# Altium PCB 400390.PcbDoc (part 2 of 5)
Units mm, origin at the board's own origin, x right, y up, seen from the top; angles counter-clockwise.
Board outline 50.8 x 50.4 mm, 4 copper layers (Top Layer, Mid Layer 1, Mid Layer 2, Bottom Layer), stack 1.507 mm thick; 262 components, 210 nets, 1216 pads, 1075 vias.
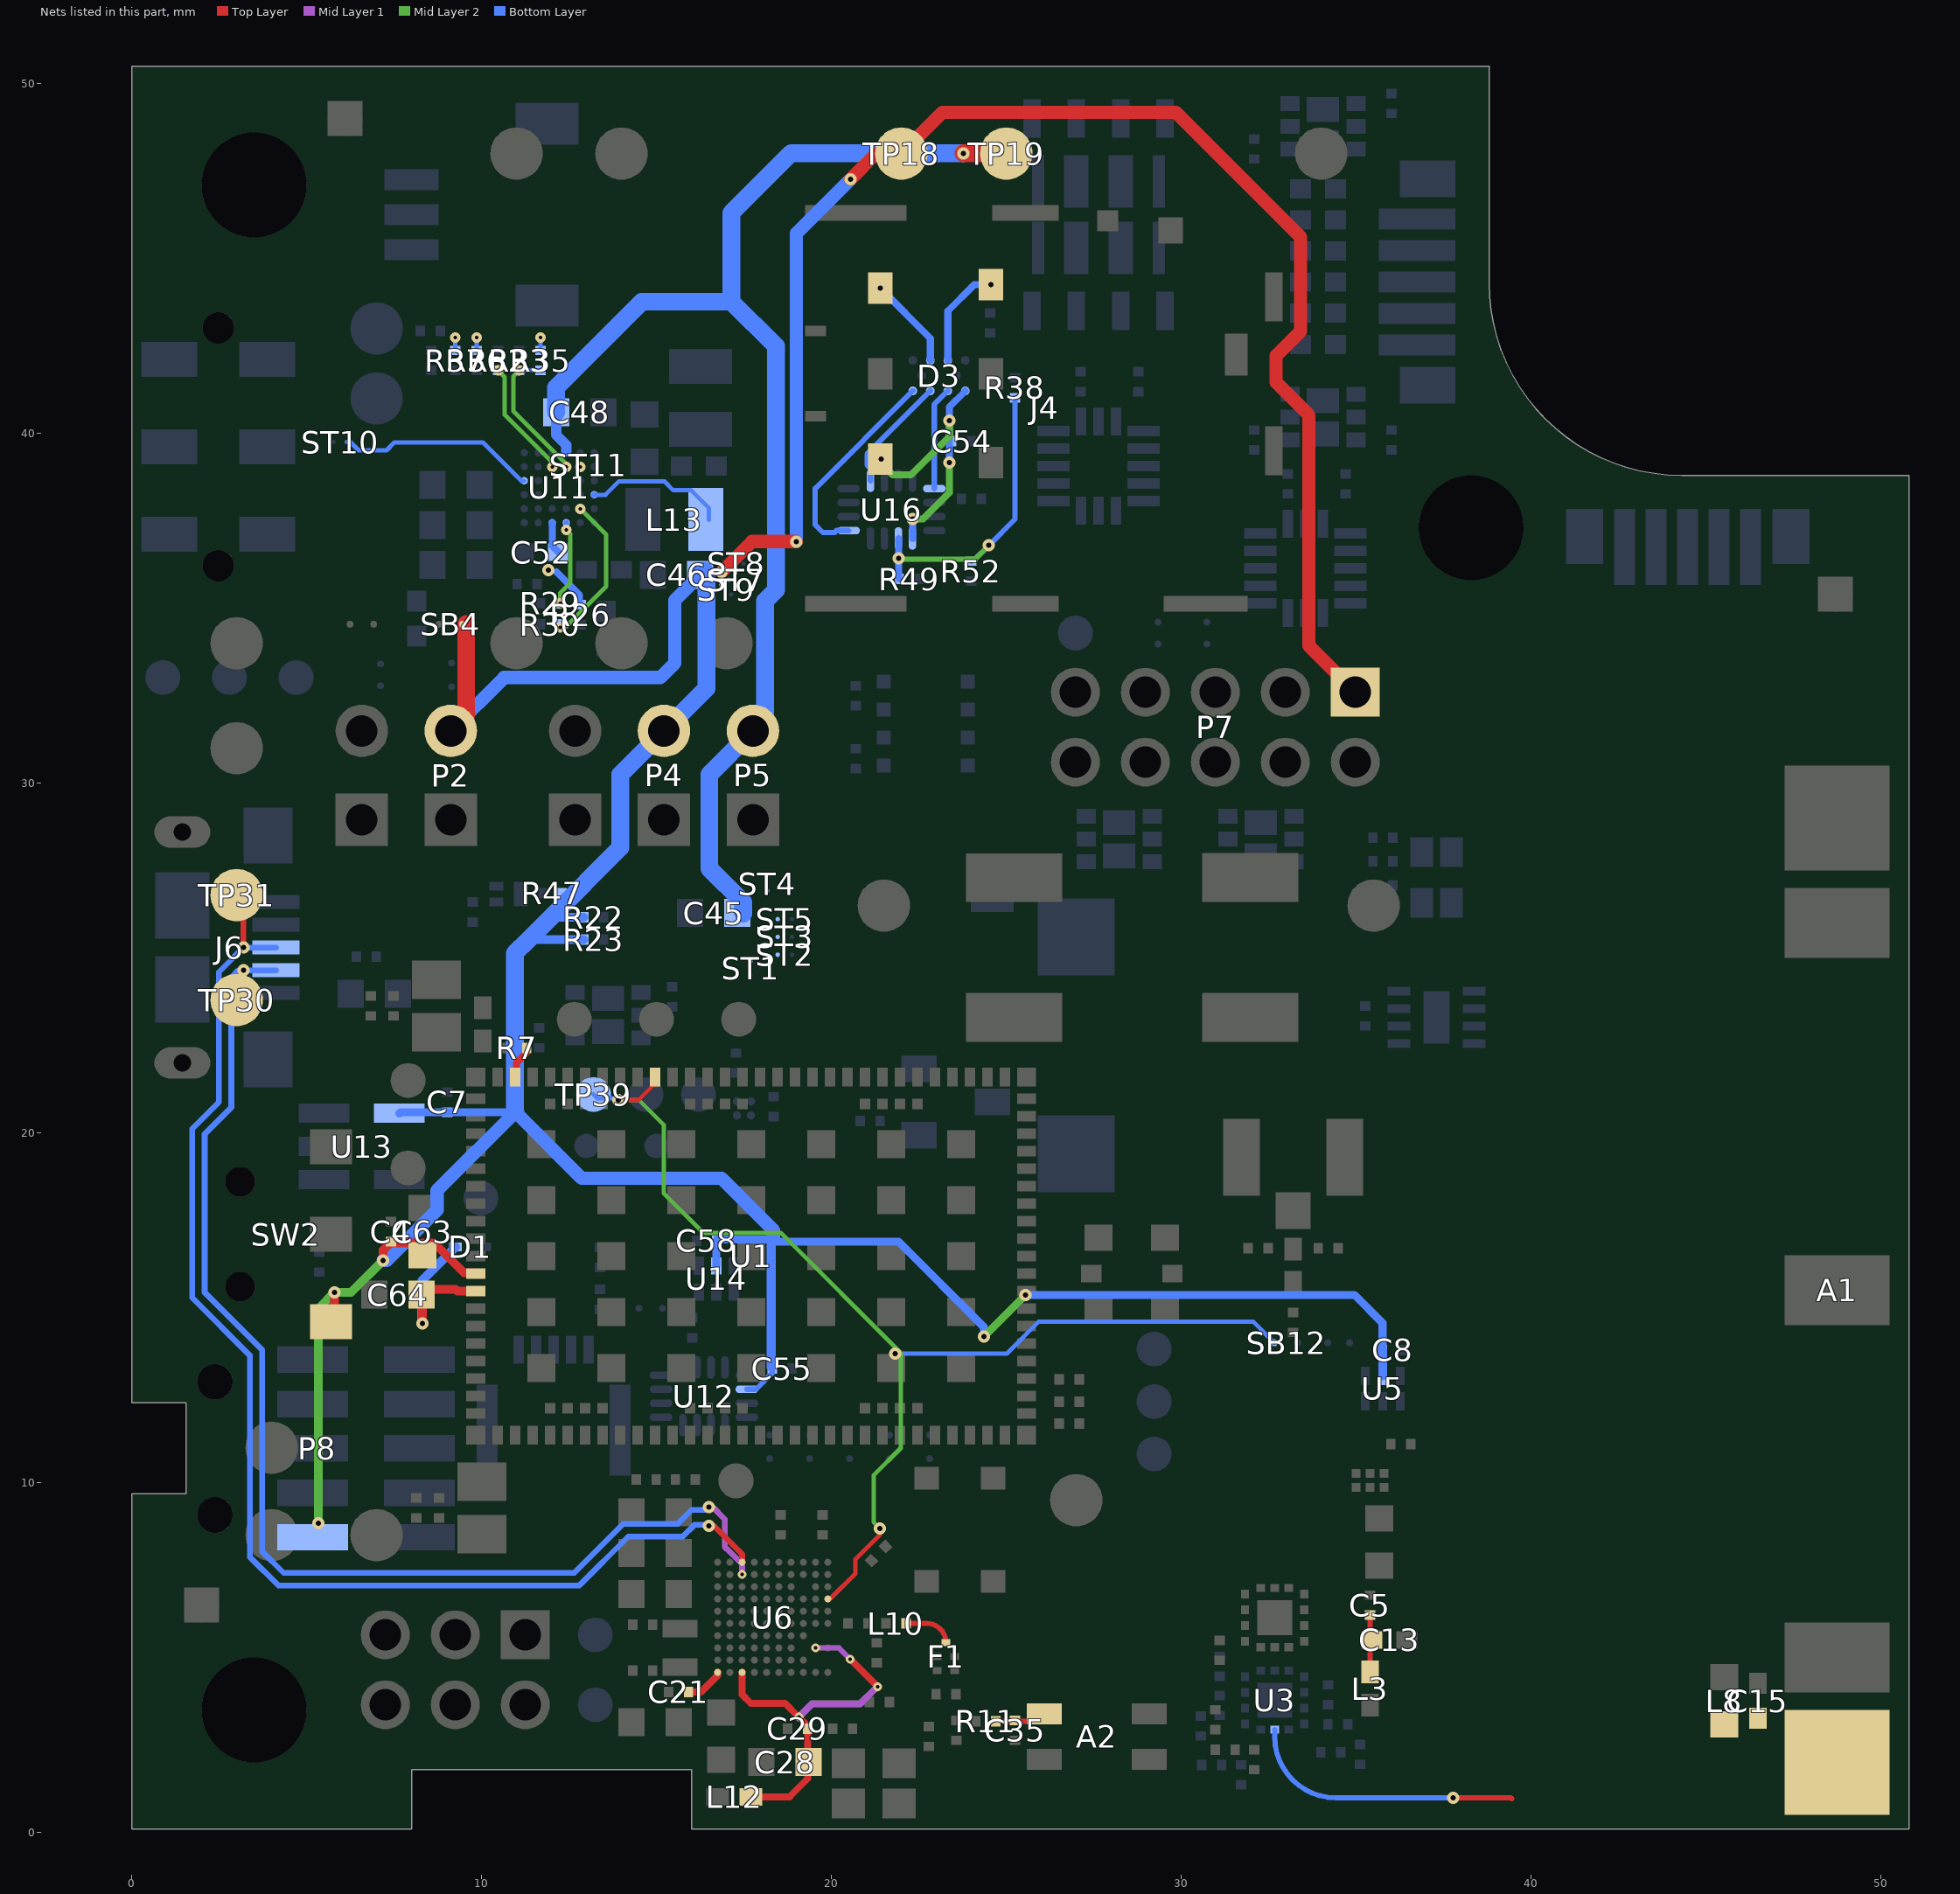
[diagram p4: the nets of this part, all layers, seen from the top]

## Part data
A1: library part FR01-S4-210-D, "Mobile IoT LTE Multi-Band Antenna", Manufacturer="Fractus Antennas", Part number IPS=80000001819, Supplier Part Number 1=N.A., Artikkelnr Noca=N.A., Component Class=Antennas, ComponentLink1Description=Datasheet, ComponentLink1URL=https://www.fractusantennas.com/wp-content/uploads/2018/01/DS_FR01-S4-210.pdf, ComponentLink2Description="Supplier link", ComponentLink2URL=https://www.fractusantennas.com/trio-mxtend-mobile-iot-antenna/, Footprint Doc=FR01-S4-210, HelpURL=https://www.fractusantennas.com/wp-content/uploads/2018/02/UM_FR01-S4-210.pdf, LatestRevisionDate=2018-07-09, Manufacturer Part Number=FR01-S4-210, Note=N.A., Pad Count=5, Part Number=FR01-S4-210-D, PartId=100700054, Published=2018-07-09, Supplier 1=N.A., Supplier 2=N.A., Supplier Part Number 2=N.A.
A2: library part "Johanson 2450AT18D0100_STD-R", "2.45 GHz chip antenna", Manufacturer="Johanson Technology", Part number IPS=00000001415, Supplier Part Number 1=2450AT18D0100E, Artikkelnr Noca=53059035, Component Class=Antennas, ComponentLink1Description=Datasheet, ComponentLink1URL=N.A., ComponentLink2Description="Supplier link", ComponentLink2URL=N.A., Footprint Doc=2450AT18D0100, HelpURL=http://www.johansontechnology.com/datasheets/antennas/2450AT18D0100.pdf, LatestRevisionDate=2016-06-02, Manufacturer Part Number=2450AT18D0100, Note=N.A., Pad Count=4, Part Number="Johanson 2450AT18D0100_STD-R", PartId=100700005, Published=2016-01-12, Supplier 1=Digi-Key, Supplier 2=Mouser, Supplier Part Number 2=609-2450AT18D0100E
Bz1: library part AST7525MATRQ, "Buzzer Transducer, 3.6V 100mA 2.7kHz 85dB @ 3.6V, SMD", Manufacturer=Mallory, Part number IPS=00000001770, Supplier Part Number 1=458-1100-1-ND, Artikkelnr Noca=N.A., Component Class=Transducers, ComponentLink1Description=Datasheet, ComponentLink1URL=N.A., ComponentLink2Description="Supplier link", ComponentLink2URL=N.A., Footprint Doc=Buzzer_SMD_7.5x7.5, HelpURL=https://www.mspindy.com/specifications/AST7525MATRQ.pdf, LatestRevisionDate=2019-01-14, Manufacturer Part Number=AST7525MATRQ, Note=N.A., Pad Count=2, Part Number=AST7525MATRQ, PartId=101000024, Published=2019-01-14, Supplier 1=Digi-Key, Supplier 2=Mouser, Supplier Part Number 2=539-AST7525MATRQ
C1 C65: library part C0201-15p, "Capacitor, NP0, ±5%, 25V", Manufacturer=N.A., Part number IPS=00000003193, Artikkelnr Noca=N.A., Component Class=Capacitors, ComponentLink1Description=Datasheet, ComponentLink1URL=N.A., ComponentLink2Description="Supplier link", ComponentLink2URL=N.A., Footprint Doc=0201, HelpURL=N.A., LatestRevisionDate=2020-10-13, Manufacturer Part Number=N.A., Note=25V, Pad Count=2, Part Number=C0201-15p, PartId=100200034, Published=2014-11-13, Supplier 1=N.A., Supplier 2=N.A., Supplier Part Number 1=N.A., Supplier Part Number 2=N.A.
C2 C4 C7 C8 C21 C23 C24 C26 C34 C36 C37 C38 C39 C40 C41 C42 C44 C55 C58 C66 C68: library part C0201-100n, "Capacitor, X5R, ±10%", Manufacturer=N.A., Part number IPS="00000001248, 00000002505", Artikkelnr Noca=N.A., Component Class=Capacitors, ComponentLink1Description=Datasheet, ComponentLink1URL=N.A., ComponentLink2Description="Supplier link", ComponentLink2URL=N.A., Footprint Doc=0201, HelpURL=N.A., LatestRevisionDate=2017-11-09, Manufacturer Part Number=N.A., Note=16V, Pad Count=2, Part Number=C0201-100n, PartId=100200078, Published=2014-11-13, Supplier 1=N.A., Supplier 2=N.A., Supplier Part Number 1=N.A., Supplier Part Number 2=N.A.
C3 C67: library part C0805-47µ-10V, "Capacitor, X5R, ±20%, 10V", Manufacturer=Murata, Manufacturer Part Number=GRM21BR61A476ME15, Part number IPS=00000004759, Supplier Part Number 1=490-9961-1-ND, Artikkelnr Noca=N.A., Component Class=Capacitors, ComponentLink1Description=Datasheet, ComponentLink1URL=https://search.murata.co.jp/Ceramy/image/img/A01X/G101/ENG/GRM21BR61A476ME15-01A.pdf, ComponentLink2Description="Supplier link", ComponentLink2URL=N.A., Footprint Doc=0805, HelpURL=https://www.murata.com/en-global/products/productdetail?partno=GRM21BR61A476ME15%23, LatestRevisionDate=2020-10-23, Note=10V, Pad Count=2, Part Number=C0805-47µ-10V, PartId=100200288, Published=2020-08-14, Supplier 1=Digi-Key, Supplier 2=N.A., Supplier Part Number 2=N.A.
C5: library part C0201-1n0, "Capacitor, X7R, ±10%, 25V", Manufacturer=N.A., Part number IPS=00000003206, Artikkelnr Noca=N.A., Component Class=Capacitors, ComponentLink1Description=Datasheet, ComponentLink1URL=N.A., ComponentLink2Description="Supplier link", ComponentLink2URL=N.A., Footprint Doc=0201, HelpURL=N.A., LatestRevisionDate=2020-10-13, Manufacturer Part Number=N.A., Note=16V, Pad Count=2, Part Number=C0201-1n0, PartId=100200056, Published=2014-11-13, Supplier 1=N.A., Supplier 2=N.A., Supplier Part Number 1=N.A., Supplier Part Number 2=N.A.
C6: library part C0201-33n, "Capacitor, X5R, ±10%", Manufacturer=N.A., Part number IPS=00000003839, Artikkelnr Noca=N.A., Component Class=Capacitors, ComponentLink1Description=Datasheet, ComponentLink1URL=N.A., ComponentLink2Description="Supplier link", ComponentLink2URL=N.A., Footprint Doc=0201, HelpURL=N.A., LatestRevisionDate=2020-01-07, Manufacturer Part Number=N.A., Note=10V, Pad Count=2, Part Number=C0201-33n, PartId=100200073, Published=2014-11-13, Supplier 1=N.A., Supplier 2=N.A., Supplier Part Number 1=N.A., Supplier Part Number 2=N.A.
C9: library part C0201-2.5p-HQ-Murata, "Capacitor, NP0, ±0.05pF, 25V", Manufacturer=Murata, Manufacturer Part Number=GJM0335C1E2R5WB01, Part number IPS="00000001771, 80000001936", Supplier Part Number 1=N.A., Artikkelnr Noca=N.A., Component Class=Capacitors, ComponentLink1Description=Datasheet, ComponentLink1URL=N.A., ComponentLink2Description="Supplier link", ComponentLink2URL=N.A., Footprint Doc=0201, HelpURL=https://psearch.en.murata.com/capacitor/product/GJM0335C1E2R5WB01%23.html, LatestRevisionDate=2020-02-07, Note=25V, Pad Count=2, Part Number=C0201-2.5p-HQ-Murata, PartId=100200420, Published=2019-01-14, Supplier 1=N.A., Supplier 2=N.A., Supplier Part Number 2=N.A.
C10: library part C0201-5.5p-HQ-Murata, "Capacitor, NP0, ±0.05pF, 25V", Manufacturer=Murata, Manufacturer Part Number=GJM0332C1H5R5WB01, Part number IPS="00000001772, 80000001937", Supplier Part Number 1=N.A., Artikkelnr Noca=N.A., Component Class=Capacitors, ComponentLink1Description=Datasheet, ComponentLink1URL=N.A., ComponentLink2Description="Supplier link", ComponentLink2URL=N.A., Footprint Doc=0201, HelpURL=https://psearch.en.murata.com/capacitor/product/GJM0332C1H5R5WB01%23.html, LatestRevisionDate=2019-10-28, Note=25V, Pad Count=2, Part Number=C0201-5.5p-HQ-Murata, PartId=100200425, Published=2019-10-28, Supplier 1=N.A., Supplier 2=N.A., Supplier Part Number 2=N.A.
C11: library part C0201-9.2p-HQ-Murata, "Capacitor, NP0, ±0.05pF, 25V", Manufacturer=Murata, Manufacturer Part Number=GJM0332C1E9R2WB01, Part number IPS=80000001956, Supplier Part Number 1=N.A., Artikkelnr Noca=N.A., Component Class=Capacitors, ComponentLink1Description=Datasheet, ComponentLink1URL=N.A., ComponentLink2Description="Supplier link", ComponentLink2URL=N.A., Footprint Doc=0201, HelpURL=https://psearch.en.murata.com/capacitor/product/GJM0332C1E9R2WB01%23.html, LatestRevisionDate=2019-03-27, Note=25V, Pad Count=2, Part Number=C0201-9.2p-HQ-Murata, PartId=100200427, Published=2019-03-27, Supplier 1=N.A., Supplier 2=N.A., Supplier Part Number 2=N.A.
C12: library part C0201-1.5p-HQ-Murata, "Capacitor, NP0, ±0.05pF, 25V", Manufacturer=Murata, Manufacturer Part Number=GJM0334C1E1R5WB01, Part number IPS="00000001774, 80000001939", Supplier Part Number 1=N.A., Artikkelnr Noca=N.A., Component Class=Capacitors, ComponentLink1Description=Datasheet, ComponentLink1URL=N.A., ComponentLink2Description="Supplier link", ComponentLink2URL=N.A., Footprint Doc=0201, HelpURL=https://psearch.en.murata.com/capacitor/product/GJM0334C1E1R5WB01%23.html, LatestRevisionDate=2019-01-14, Note=25V, Pad Count=2, Part Number=C0201-1.5p-HQ-Murata, PartId=100200418, Published=2019-01-14, Supplier 1=N.A., Supplier 2=N.A., Supplier Part Number 2=N.A.
C13: library part C0402-2.5p-HQ-Murata, "Capacitor, NP0, ±0.05pF, 50V", Manufacturer=Murata, Manufacturer Part Number=GJM1555C1H2R5WB01, Part number IPS=00000004340, Supplier Part Number 1=490-11208-1-ND, Artikkelnr Noca=N.A., Component Class=Capacitors, ComponentLink1Description=Datasheet, ComponentLink1URL=N.A., ComponentLink2Description="Supplier link", ComponentLink2URL=N.A., Footprint Doc=0402, HelpURL=https://psearch.en.murata.com/capacitor/product/GJM1555C1H2R5WB01%23.html, LatestRevisionDate=2020-02-07, Note=50V, Pad Count=2, Part Number=C0402-2.5p-HQ-Murata, PartId=100200428, Published=2020-02-07, Supplier 1=Digi-Key, Supplier 2=N.A., Supplier Part Number 2=N.A.
C14: library part C0201-3.1p-HQ-Murata, "Capacitor, NP0, ±0.05pF, 25V", Manufacturer=Murata, Manufacturer Part Number=GJM0335C1E3R1WB01, Part number IPS="00000001776, 80000001941", Supplier Part Number 1=N.A., Artikkelnr Noca=N.A., Component Class=Capacitors, ComponentLink1Description=Datasheet, ComponentLink1URL=N.A., ComponentLink2Description="Supplier link", ComponentLink2URL=N.A., Footprint Doc=0201, HelpURL=https://psearch.en.murata.com/capacitor/product/GJM0335C1E3R1WB01%23.html, LatestRevisionDate=2019-01-14, Note=25V, Pad Count=2, Part Number=C0201-3.1p-HQ-Murata, PartId=100200423, Published=2019-01-14, Supplier 1=N.A., Supplier 2=N.A., Supplier Part Number 2=N.A.
C15: library part C0402-0.5p-HQ-Murata, "Capacitor, NP0, ±0.05pF, 50V", Manufacturer=Murata, Manufacturer Part Number=GJM1555C1HR50WB01, Part number IPS=00000004293, Supplier Part Number 1=490-11250-1-ND, Artikkelnr Noca=N.A., Component Class=Capacitors, ComponentLink1Description=Datasheet, ComponentLink1URL=https://search.murata.co.jp/Ceramy/image/img/A01X/G101/ENG/GJM1555C1HR50WB01-01.pdf, ComponentLink2Description="Supplier link", ComponentLink2URL=N.A., Footprint Doc=0402, HelpURL=https://psearch.en.murata.com/capacitor/product/GJM1555C1HR50WB01%23.html, LatestRevisionDate=2020-02-07, Note=50V, Pad Count=2, Part Number=C0402-0.5p-HQ-Murata, PartId=100200434, Published=2020-02-07, Supplier 1=Digi-Key, Supplier 2=Mouser, Supplier Part Number 2=81-GJM1555C1HR50WB1D
C16 C17: library part C0201-2n2, "Capacitor, X7R, ±10%, 10V", Manufacturer=N.A., Part number IPS=00000001778, Artikkelnr Noca=N.A., Component Class=Capacitors, ComponentLink1Description=Datasheet, ComponentLink1URL=N.A., ComponentLink2Description="Supplier link", ComponentLink2URL=N.A., Footprint Doc=0201, HelpURL=N.A., LatestRevisionDate=2014-11-13, Manufacturer Part Number=N.A., Note=10V, Pad Count=2, Part Number=C0201-2n2, PartId=100200060, Published=2014-11-13, Supplier 1=N.A., Supplier 2=N.A., Supplier Part Number 1=N.A., Supplier Part Number 2=N.A.
C18 C19 C30 C31: library part C0201-12p, "Capacitor, NP0, ±2%", Manufacturer=N.A., Part number IPS=00000007848, Artikkelnr Noca=N.A., Component Class=Capacitors, ComponentLink1Description=Datasheet, ComponentLink1URL=N.A., ComponentLink2Description="Supplier link", ComponentLink2URL=N.A., Footprint Doc=0201, HelpURL=N.A., LatestRevisionDate=2017-11-09, Manufacturer Part Number=N.A., Note=25V, Pad Count=2, Part Number=C0201-12p, PartId=100200033, Published=2014-11-13, Supplier 1=N.A., Supplier 2=N.A., Supplier Part Number 1=N.A., Supplier Part Number 2=N.A.
C20: library part C0201-1.0p, "Capacitor, NP0, ±0.05pF, 50V", Manufacturer=N.A., Part number IPS=00000001247, Artikkelnr Noca=N.A., Component Class=Capacitors, ComponentLink1Description=Datasheet, ComponentLink1URL=N.A., ComponentLink2Description="Supplier link", ComponentLink2URL=N.A., Footprint Doc=0201, HelpURL=N.A., LatestRevisionDate=2018-10-22, Manufacturer Part Number=N.A., Note=50V, Pad Count=2, Part Number=C0201-1.0p, PartId=100200014, Published=2014-11-13, Supplier 1=N.A., Supplier 2=N.A., Supplier Part Number 1=N.A., Supplier Part Number 2=N.A.
C22 C32: library part C0603-4µ7-6.3V-X7R, "Capacitor, X7R, ±10%, 6.3V", Manufacturer="Samsung Electro-Mechanics America", Manufacturer Part Number=CL10B475KQ8NQNC, Part number IPS=00000002541, Supplier Part Number 1=1276-2087-1-ND, Artikkelnr Noca=20039473, Component Class=Capacitors, ComponentLink1Description=Datasheet, ComponentLink1URL=N.A., ComponentLink2Description="Supplier link", ComponentLink2URL=N.A., Footprint Doc=0603, HelpURL=http://media.digikey.com/pdf/Data%20Sheets/Samsung%20PDFs/CL10B475KQ8NQNC_Spec.pdf, LatestRevisionDate=2015-06-10, Note=6.3V, Pad Count=2, Part Number=C0603-4µ7-6.3V-X7R, PartId=100200350, Published=2015-06-10, Supplier 1=Digi-Key, Supplier 2=N.A., Supplier Part Number 2=N.A.
C25: library part C0201-820p, "Capacitor, X7R, ±10%", Manufacturer=N.A., Part number IPS=00000001249, Artikkelnr Noca=N.A., Component Class=Capacitors, ComponentLink1Description=Datasheet, ComponentLink1URL=N.A., ComponentLink2Description="Supplier link", ComponentLink2URL=N.A., Footprint Doc=0201, HelpURL=N.A., LatestRevisionDate=2017-11-09, Manufacturer Part Number=N.A., Note=25V, Pad Count=2, Part Number=C0201-820p, PartId=100200055, Published=2014-11-13, Supplier 1=N.A., Supplier 2=N.A., Supplier Part Number 1=N.A., Supplier Part Number 2=N.A.
C27 C28 C49: library part C0603-1µ0, "Capacitor, X7R, ±10%", Manufacturer=N.A., Part number IPS=00000000616, Artikkelnr Noca=20039282, Component Class=Capacitors, ComponentLink1Description=Datasheet, ComponentLink1URL=N.A., ComponentLink2Description="Supplier link", ComponentLink2URL=N.A., Footprint Doc=0603, HelpURL=N.A., LatestRevisionDate=2013-06-05, Manufacturer Part Number=N.A., Note=16V, Pad Count=2, Part Number=C0603-1µ0, PartId=100200271, Published=2009-05-08, Supplier 1=N.A., Supplier 2=N.A., Supplier Part Number 1=N.A., Supplier Part Number 2=N.A.
C29: library part C0201-47n, "Capacitor, X5R, ±10%", Manufacturer=N.A., Part number IPS=00000001250, Artikkelnr Noca=N.A., Component Class=Capacitors, ComponentLink1Description=Datasheet, ComponentLink1URL=N.A., ComponentLink2Description="Supplier link", ComponentLink2URL=N.A., Footprint Doc=0201, HelpURL=N.A., LatestRevisionDate=2017-11-09, Manufacturer Part Number=N.A., Note=10V, Pad Count=2, Part Number=C0201-47n, PartId=100200074, Published=2014-11-13, Supplier 1=N.A., Supplier 2=N.A., Supplier Part Number 1=N.A., Supplier Part Number 2=N.A.
C33: library part C0603-4µ7-10V-X7S, "Capacitor, X7S, ±10%, 10V", Manufacturer=N.A., Part number IPS=00000001779, Supplier Part Number 1=445-14258-1-ND, Artikkelnr Noca=20030013, Component Class=Capacitors, ComponentLink1Description=Datasheet, ComponentLink1URL=N.A., ComponentLink2Description="Supplier link", ComponentLink2URL=N.A., Footprint Doc=0603, HelpURL=N.A., LatestRevisionDate=2016-08-15, Manufacturer Part Number=N.A., Note=10V, Pad Count=2, Part Number=C0603-4µ7-10V-X7S, PartId=100200351, Published=2016-08-15, Supplier 1=Digi-Key, Supplier 2=N.A., Supplier Part Number 2=N.A.
C35: library part C0201-0.8p, "Capacitor, NP0, ±0.05pF, 50V", Manufacturer=Murata, Manufacturer Part Number=GJM0335C1HR80WB01, Part number IPS=80000001975, Supplier Part Number 1=N.A., Artikkelnr Noca=N.A., Component Class=Capacitors, ComponentLink1Description=Datasheet, ComponentLink1URL=N.A., ComponentLink2Description="Supplier link", ComponentLink2URL=N.A., Footprint Doc=0201, HelpURL=N.A., LatestRevisionDate=2018-10-22, Note=50V, Pad Count=2, Part Number=C0201-0.8p, PartId=100200012, Published=2014-11-13, Supplier 1=N.A., Supplier 2=N.A., Supplier Part Number 2=N.A.
C43 C51: library part C0603-10µ, "Capacitor, X5R, ±20%", Manufacturer=N.A., Part number IPS=00000007785, Artikkelnr Noca=20039234, Component Class=Capacitors, ComponentLink1Description=Datasheet, ComponentLink1URL=N.A., ComponentLink2Description="Supplier link", ComponentLink2URL=N.A., Footprint Doc=0603, HelpURL=N.A., LatestRevisionDate=2011-01-17, Manufacturer Part Number=N.A., Note=6.3V, Pad Count=2, Part Number=C0603-10µ, PartId=100200275, Published=2011-01-17, Supplier 1=N.A., Supplier 2=N.A., Supplier Part Number 1=N.A., Supplier Part Number 2=N.A.
C45 C50 C63 C64: library part C0603-4µ7, "Capacitor, X5R, ±10%", Manufacturer=N.A., Part number IPS=00000007783, Artikkelnr Noca=20069060, Component Class=Capacitors, ComponentLink1Description=Datasheet, ComponentLink1URL=N.A., ComponentLink2Description="Supplier link", ComponentLink2URL=N.A., Footprint Doc=0603, HelpURL=N.A., LatestRevisionDate=2009-11-23, Manufacturer Part Number=N.A., Note=6.3V, Pad Count=2, Part Number=C0603-4µ7, PartId=100200274, Published=2009-05-08, Supplier 1=N.A., Supplier 2=N.A., Supplier Part Number 1=N.A., Supplier Part Number 2=N.A.
C46 C48: library part C0603-22µ-6.3V, "Capacitor, X5R, ±20%, 6.3V", Manufacturer="Samsung Electro-Mechanics America", Manufacturer Part Number=CL10A226MQ8NRNC, Part number IPS=00000007787, Supplier Part Number 1=1276-1193-1-ND, Artikkelnr Noca=N.A., Component Class=Capacitors, ComponentLink1Description=Datasheet, ComponentLink1URL=N.A., ComponentLink2Description="Supplier link", ComponentLink2URL=N.A., Footprint Doc=0603, HelpURL=http://www.samsungsem.com/kr/front/downloadcms.do?path=/kr/support/product-search/mlcc/__icsFiles/afieldfile/2014/11/05&fileName=S_CL10A226MQ8NRNC.pdf, LatestRevisionDate=2015-04-10, Note=6.3V, Pad Count=2, Part Number=C0603-22µ-6.3V, PartId=100200363, Published=2015-04-10, Supplier 1=Digi-Key, Supplier 2=N.A., Supplier Part Number 2=N.A.
C47 C52: library part C0402-1µ0, "Capacitor, X5R, ±5%, 6.3V", Manufacturer=N.A., Part number IPS="00000007786, 00000003457", Supplier Part Number 1=1276-1444-1-ND, Artikkelnr Noca=20039235, Component Class=Capacitors, ComponentLink1Description=Datasheet, ComponentLink1URL=N.A., ComponentLink2Description="Supplier link", ComponentLink2URL=N.A., Footprint Doc=0402, HelpURL=N.A., LatestRevisionDate=2016-08-22, Manufacturer Part Number=N.A., Note=6.3V, Pad Count=2, Part Number=C0402-1µ0, PartId=100200190, Published=2009-05-08, Supplier 1=Digi-Key, Supplier 2=N.A., Supplier Part Number 2=N.A.
C53: library part C0603-2µ2-10V, "Capacitor, X7R, ±10%, 10V", Manufacturer="Samsung Electro-Mechanics America", Manufacturer Part Number=CL10B225KP8NNNC, Part number IPS=00000001781, Supplier Part Number 1=1276-1134-1-ND, Artikkelnr Noca=20030083, Component Class=Capacitors, ComponentLink1Description=Datasheet, ComponentLink1URL=N.A., ComponentLink2Description="Supplier link", ComponentLink2URL=N.A., Footprint Doc=0603, HelpURL=http://www.samsungsem.com/kr/front/downloadcms.do?path=/kr/support/product-search/mlcc/__icsFiles/afieldfile/2014/11/05&fileName=C_CL10B225KP8NNNC.pdf, LatestRevisionDate=2016-10-10, Note=10V, Pad Count=2, Part Number=C0603-2µ2-10V, PartId=100200393, Published=2016-10-10, Supplier 1=Digi-Key, Supplier 2=N.A., Supplier Part Number 2=N.A.
C54: library part C0201-10n, "Capacitor, X7R, ±10%", Manufacturer=N.A., Part number IPS=00000003480, Artikkelnr Noca=N.A., Component Class=Capacitors, ComponentLink1Description=Datasheet, ComponentLink1URL=N.A., ComponentLink2Description="Supplier link", ComponentLink2URL=N.A., Footprint Doc=0201, HelpURL=N.A., LatestRevisionDate=2017-11-09, Manufacturer Part Number=N.A., Note=10V, Pad Count=2, Part Number=C0201-10n, PartId=100200067, Published=2014-11-13, Supplier 1=N.A., Supplier 2=N.A., Supplier Part Number 1=N.A., Supplier Part Number 2=N.A.
C56 C57: library part C0201-560p, "Capacitor, NP0, ±5%, 25V", Manufacturer=N.A., Part number IPS=00000001808, Artikkelnr Noca=N.A., Component Class=Capacitors, ComponentLink1Description=Datasheet, ComponentLink1URL=N.A., ComponentLink2Description="Supplier link", ComponentLink2URL=N.A., Footprint Doc=0201, HelpURL=N.A., LatestRevisionDate=2020-12-16, Manufacturer Part Number=N.A., Note=25V, Pad Count=2, Part Number=C0201-560p, PartId=100200053, Published=2014-11-13, Supplier 1=N.A., Supplier 2=N.A., Supplier Part Number 1=N.A., Supplier Part Number 2=N.A.
C59: library part C0201-N.C., "Not mounted", Manufacturer=N.A., Artikkelnr Noca=N.A., Assembly="Not mounted", Component Class=Capacitors, ComponentLink1Description=Datasheet, ComponentLink1URL=N.A., ComponentLink2Description="Supplier link", ComponentLink2URL=N.A., Footprint Doc=0201, HelpURL=N.A., LatestRevisionDate=2014-11-13, Manufacturer Part Number=N.A., Note="Chip Cap", Pad Count=2, Part Number=C0201-N.C., Part number IPS=N.A., PartId=100200001, Published=2014-11-13, Supplier 1=N.A., Supplier 2=N.A., Supplier Part Number 1=N.A., Supplier Part Number 2=N.A.
C60 C61 C62: library part C0201-39p, "Capacitor, NP0, ±1%, 25V", Manufacturer=Murata, Manufacturer Part Number=GRM0335C1E390FA01, Part number IPS=00000001668, Supplier Part Number 1=N.A., Artikkelnr Noca=N.A., Component Class=Capacitors, ComponentLink1Description=Datasheet, ComponentLink1URL=N.A., ComponentLink2Description="Supplier link", ComponentLink2URL=N.A., Footprint Doc=0201, HelpURL=N.A., LatestRevisionDate=2019-04-16, Note=25V, Pad Count=2, Part Number=C0201-39p, PartId=100200039, Published=2019-04-16, Supplier 1=N.A., Supplier 2=N.A., Supplier Part Number 2=N.A.
CR1: "ESD Suppressor, 30V, 0.04pF", Manufacturer=Panasonic, Part number IPS=00000004437, Supplier Part Number 1=P122037CT-ND, Artikkelnr Noca=N.A., Component Class=Semiconductors, ComponentLink1Description=Datasheet, ComponentLink1URL=https://industrial.panasonic.com/cdbs/www-data/pdf/AWD0000/AWD0000C13.pdf, ComponentLink2Description="Supplier link", ComponentLink2URL=N.A., Footprint Doc=0201, HelpURL=N.A., LatestRevisionDate=2020-04-28, Manufacturer Part Number=EZA-EG1N50AC, Note=N.A., Pad Count=2, Part Number=EZA-EG1N50AC, PartId=101300173, Published=2020-02-06, Supplier 1=Digi-Key, Supplier 2=N.A., Supplier Part Number 2=N.A.
D1: "20V schottky barrier diode, Vf 350 mV @ 100 mA, Ir 2.0 µA @ 10 V, If 500 mA", Manufacturer="ON Semiconductor", Part number IPS=00000009952, Supplier Part Number 1=NSR0620P2T5GOSCT-ND, Artikkelnr Noca=10029169, Component Class=Semiconductors, ComponentLink1Description=Datasheet, ComponentLink1URL=N.A., ComponentLink2Description="Supplier link", ComponentLink2URL=N.A., Footprint Doc=SOD-923, HelpURL=http://www.onsemi.com/pub_link/Collateral/NSR0620P2-D.PDF, LatestRevisionDate=2016-07-07, Manufacturer Part Number=NSR0620P2T5G, Note=N.A., Pad Count=2, Part Number=NSR0620P2T5G, PartId=101300131, Published=2016-07-07, Supplier 1=Digi-Key, Supplier 2=N.A., Supplier Part Number 2=N.A.
D2: "1N4148, Small Signal Fast Switching Diode", Manufacturer=Vishay, Manufacturer Part Number=1N4148W-E3-08, Part number IPS=00000001783, Supplier Part Number 1=237-7282, Artikkelnr Noca=N.A., Component Class=Semiconductors, ComponentLink1Description=Datasheet, ComponentLink1URL=N.A., ComponentLink2Description="Supplier link", ComponentLink2URL=N.A., Footprint Doc=SOD-123, HelpURL=http://www.vishay.com/docs/85748/1n4148w.pdf, LatestRevisionDate=2016-01-12, Note="Small Signal Fast Switching Diode", Pad Count=2, Part Number=1N4148W, PartId=101300078, Published=2011-04-21, Supplier 1=Farnell, Supplier 2=Digi-Key, Supplier Part Number 2=1N4148W-E3-08CT-ND
D3: "EMI Network Filter Arrays SIM CARD EMI FILTER WITH ESD PROTECTION", Manufacturer="ON Semiconductor", Manufacturer Part Number=CM1402-03CP, Part number IPS=00000009949, Supplier Part Number 1=CM1402-03CPOSTR-ND, Artikkelnr Noca=N.A., Component Class=Semiconductors, ComponentLink1Description=Datasheet, ComponentLink1URL=N.A., ComponentLink2Description="Supplier link", ComponentLink2URL=N.A., Footprint Doc=CM1402, HelpURL=http://www.onsemi.com/pub_link/Collateral/CM1402-D.PDF, LatestRevisionDate=2017-02-06, Note=N.A., Pad Count=10, Part Number=CM1402, PartId=101300139, Published=2017-02-06, Supplier 1=Digi-Key, Supplier 2=Mouser, Supplier Part Number 2=748-CM1402-03CP
F1: "2.4 GHz BPF", Manufacturer=Murata, Part number IPS="00000001784, 80000001660", Supplier Part Number 1=N.A., Artikkelnr Noca=N.A., Component Class=Filters, ComponentLink1Description=Datasheet, ComponentLink1URL=N.A., ComponentLink2Description="Supplier link", ComponentLink2URL=N.A., Footprint Doc=1109, HelpURL=N.A., LatestRevisionDate=2018-05-15, Manufacturer Part Number=SAFFB2G45MA0F0A, Note=N.A., Pad Count=5, Part Number=SAFFB2G45MA0F0A, PartId=100800023, Published=2018-05-15, Supplier 1=N.A., Supplier 2=N.A., Supplier Part Number 2=N.A.
FB1: library part FB0402-120R@100M-700mA, "Ferrite Bead, 120 Ohm @ 100MHz, 700mA, 130 mOhm Max", Manufacturer=Murata, Manufacturer Part Number=BLM15AX121SN1, Part number IPS=00000004487, Supplier Part Number 1=490-5439-1-ND, Artikkelnr Noca=N.A., Component Class=Inductors, ComponentLink1Description=Datasheet, ComponentLink1URL=https://www.murata.com/en-us/products/productdata/8796740059166/ENFA0018.pdf, ComponentLink2Description="Supplier link", ComponentLink2URL=N.A., Footprint Doc=0402, HelpURL=https://www.murata.com/products/productdetail?partno=BLM15AX121SN1%23, LatestRevisionDate=2020-04-28, Note=N.A., Pad Count=2, Part Number=FB0402-120R@100M-700mA, PartId=100300100, Published=2020-04-28, Supplier 1=Digi-Key, Supplier 2=N.A., Supplier Part Number 2=N.A.
Fid1 Fid2 Fid3: library part Fid-Mark-Round-Square, "Fiducial Mark", Manufacturer=N.A., Artikkelnr Noca=N.A., Component Class=Connectors, ComponentLink1Description=Datasheet, ComponentLink1URL=N.A., ComponentLink2Description="Supplier link", ComponentLink2URL=N.A., Footprint Doc=Fiducial, HelpURL=N.A., LatestRevisionDate=2017-01-30, Manufacturer Part Number=N.A., Note=N.A., Pad Count=1, Part Number=Fid-Mark-Round-Square, Part number IPS=N.A., PartId=100500075, Published=2009-12-12, Supplier 1=N.A., Supplier 2=N.A., Supplier Part Number 1=N.A., Supplier Part Number 2=N.A.
H1 H2 H3: library part Hole_3MM_NP, "Regular Non-Plated, 3mm hole", Manufacturer="Nordic Semiconductor", Manufacturer Part Number=N.A., Artikkelnr Noca=N.A., Component Class=Connectors, ComponentLink1Description=Datasheet, ComponentLink1URL=N.A., ComponentLink2Description="Supplier link", ComponentLink2URL=N.A., Footprint Doc=Hole_3MM_NP, HelpURL=N.A., LatestRevisionDate=2009-12-12, Note="Regular Non-Plated, 3mm hole", Pad Count=1, Part Number=Hole_3MM_NP, Part number IPS=N.A., PartId=100500145, Published=2009-12-12, Supplier 1=N.A., Supplier 2=N.A., Supplier Part Number 1=N.A., Supplier Part Number 2=N.A.
J1: "Coaxial Connector with Switch", Manufacturer=Murata, Part number IPS=00000009955, Supplier Part Number 1=490-4981-1-ND, Artikkelnr Noca=55029011, Component Class=Connectors, ComponentLink1Description=Datasheet, ComponentLink1URL=N.A., ComponentLink2Description="Supplier link", ComponentLink2URL=N.A., Footprint Doc=COAXIAL-SWF, HelpURL=http://www.murata.com/products/catalog/pdf/o33e.pdf, LatestRevisionDate=2014-04-24, Manufacturer Part Number=MM8130-2600, Note=N.A., Pad Count=3, Part Number=MM8130-2600, PartId=100500400, Published=2014-04-24, Supplier 1=Digi-Key, Supplier 2=Mouser, Supplier Part Number 2=81-MM8130-2600RA2
J2: library part 20279-001E-03, "Ultraminiature Coaxial Connector, 50 Ohm, SMD", Manufacturer=Wellshow, Part number IPS=00000004436, Artikkelnr Noca=N.A., Component Class=Connectors, ComponentLink1Description=Datasheet, ComponentLink1URL=\\hizz\pro\app9717\Datasheet\connectors\Wellshow\20279C18.pdf, ComponentLink2Description="Supplier link", ComponentLink2URL=N.A., Footprint Doc="COAXIAL RF MHFI", HelpURL=N.A., LatestRevisionDate=2020-04-28, Manufacturer Part Number=20279-001E-03, Note=N.A., Pad Count=3, Part Number=20279-001E-03, PartId=100500636, Published=2020-01-07, Supplier 1=Cabcon, Supplier 2=Digi-Key, Supplier Part Number 1=20279-001E-03, Supplier Part Number 2=H11891DKR-ND
J3: library part SM03B-SRSS-TB, "1.0mm pitch connector side entry SMD", Manufacturer="JST Sales America Inc.", Manufacturer Part Number=SM03B-SRSS-TB(LF)(SN), Part number IPS=00000001785, Artikkelnr Noca=N.A., Component Class=Connectors, ComponentLink1Description=Datasheet, ComponentLink1URL=N.A., ComponentLink2Description="Supplier link", ComponentLink2URL=N.A., Footprint Doc=SM03B-SRSS-TB, HelpURL=http://www.jst-mfg.com/product/pdf/eng/eSH.pdf, LatestRevisionDate=2017-10-09, Note="JST, Header", Pad Count=3, Part Number=SM03B-SRSS-TB, PartId=100500605, Published=2017-10-09, Supplier 1=Cabcon, Supplier 2=Digi-Key, Supplier Part Number 1=SM03B-SRSS-TB(LF)(SN), Supplier Part Number 2=455-1803-1-ND
J4: "n 8 (6 + 2) Position Card Connector NANO SIM Surface Mount, Right Angle Gold", Manufacturer="JAE Electronics", Part number IPS=00000009956, Supplier Part Number 1=670-2799-1-ND, Artikkelnr Noca=N.A., Component Class=Connectors, ComponentLink1Description=Datasheet, ComponentLink1URL=N.A., ComponentLink2Description="Supplier link", ComponentLink2URL=N.A., Footprint Doc=SF72S006VBAR2500, HelpURL=http://jae-connectors.com/en/pdf/MB-0282-1E_SF72.pdf, LatestRevisionDate=2016-09-09, Manufacturer Part Number=SF72S006VBAR2500, Note=N.A., Pad Count=8, Part Number=SF72S006VBAR2500, PartId=100500572, Published=2016-09-09, Supplier 1=Digi-Key, Supplier 2=Mouser, Supplier Part Number 2=656-SF72S006VBAR2500
J5: library part FPC_05P-0.5mm-RA-SMD, "0.5mm FPC, 5P,Right Angle SMT,Double Contact,H=1.2mm,White, Tin plated", Manufacturer=W-CON, Manufacturer Part Number=5141-05RZDNWR01, Part number IPS=00000007792, Artikkelnr Noca=55010020, Component Class=Connectors, ComponentLink1Description=Datasheet, ComponentLink1URL=N.A., ComponentLink2Description="Supplier link", ComponentLink2URL=N.A., Footprint Doc=FPC_05P-0.5mm-RA-SMD, HelpURL=\\hizz\pro\app9717\Datasheet\connectors\W-CON\5141-XXRZDNXX0X.pdf, LatestRevisionDate=2016-04-21, Note=N.A., Pad Count=7, Part Number=FPC_05P-0.5mm-RA-SMD, PartId=100500528, Published=2015-06-22, Supplier 1=Cabcon, Supplier 2=Digi-Key, Supplier Part Number 1=5141-05RZDNWR01, Supplier Part Number 2=WM9836CT-ND
J6: library part USB-Micro-B-RA-SMD-PiP, "MicroUSB-B-SMT", Manufacturer="Allen Creations Corp.", Manufacturer Part Number=AJU55-BS2111-L, Part number IPS=00000007790, Artikkelnr Noca=55029020, Component Class=Connectors, ComponentLink1Description=Datasheet, ComponentLink1URL=N.A., ComponentLink2Description="Supplier link", ComponentLink2URL=N.A., Footprint Doc=USB-Micro-B-RA-SMD-PiP, HelpURL="\\hizz\pro\app9717\Datasheet\connectors\Allen Creations Corp\AJU-211.pdf", LatestRevisionDate=2016-04-21, Note=N.A., Pad Count=5, Part Number=USB-Micro-B-RA-SMD-PiP, PartId=100500490, Published=2014-10-07, Supplier 1=Cabcon, Supplier 2=Digi-Key, Supplier Part Number 1=AJU55-BS2111-L, Supplier Part Number 2=609-4616-1-ND
L1: library part L0603-8n2-Wirewound-Murata, "Inductor, 800mA, ±0.5nH, 58mΩ, Q=38 @ 250MHz", Manufacturer=Murata, Manufacturer Part Number=LQW18AN8N2D10, Part number IPS=00000003972, Supplier Part Number 1=490-6914-1-ND, Artikkelnr Noca=N.A., Component Class=Inductors, ComponentLink1Description=Datasheet, ComponentLink1URL=https://search.murata.co.jp/Ceramy/image/img/P02/JELF243A-0026.pdf, ComponentLink2Description="Supplier link", ComponentLink2URL=N.A., Footprint Doc=0603, HelpURL=https://psearch.en.murata.com/inductor/product/LQW18AN8N2D10%23.html, LatestRevisionDate=2019-10-25, Note="-55°C ~ 125°C", Pad Count=2, Part Number=L0603-8n2-Wirewound-Murata, PartId=100300394, Published=2019-10-25, Supplier 1=Digi-Key, Supplier 2=N.A., Supplier Part Number 2=N.A.
L2: library part L0402-68n-Wirewound-Murata, "Inductor, 140mA, ±2%, 1960mΩ, Q=20", Manufacturer=Murata, Manufacturer Part Number=LQW15AN68NG00, Part number IPS=00000002494, Supplier Part Number 1=490-6837-1-ND, Artikkelnr Noca=N.A., Component Class=Inductors, ComponentLink1Description=Datasheet, ComponentLink1URL=https://search.murata.co.jp/Ceramy/image/img/P02/JELF243A-0050.pdf, ComponentLink2Description="Supplier link", ComponentLink2URL=N.A., Footprint Doc=0402, HelpURL=https://psearch.en.murata.com/inductor/product/LQW15AN68NG00%23.html, LatestRevisionDate=2019-04-16, Note="-55°C ~ 125°C", Pad Count=2, Part Number=L0402-68n-Wirewound-Murata, PartId=100300389, Published=2019-04-16, Supplier 1=Digi-Key, Supplier 2=N.A., Supplier Part Number 2=N.A.
L3: library part L0402-2n2-Wirewound-Murata, "Inductor, 2530mA, ±0.2nH, 22mΩ, Q=30", Manufacturer=Murata, Manufacturer Part Number=LQW15AN2N2C80, Part number IPS=00000003981, Supplier Part Number 1=490-7633-1-ND, Artikkelnr Noca=N.A., Component Class=Inductors, ComponentLink1Description=Datasheet, ComponentLink1URL=https://search.murata.co.jp/Ceramy/image/img/P02/JELF243A-0100.pdf, ComponentLink2Description="Supplier link", ComponentLink2URL=N.A., Footprint Doc=0402, HelpURL=https://psearch.en.murata.com/inductor/product/LQW15AN2N2C80%23.html, LatestRevisionDate=2020-01-07, Note="-55°C ~ 125°C", Pad Count=2, Part Number=L0402-2n2-Wirewound-Murata, PartId=100300289, Published=2019-04-16, Supplier 1=Digi-Key, Supplier 2=N.A., Supplier Part Number 2=N.A.
L4: library part L0201-N.C., "Not mounted", Manufacturer=N.A., Artikkelnr Noca=N.A., Assembly="Not mounted", Component Class=Inductors, ComponentLink1Description=Datasheet, ComponentLink1URL=N.A., ComponentLink2Description="Supplier link", ComponentLink2URL=N.A., Footprint Doc=0201, HelpURL=N.A., LatestRevisionDate=2013-04-10, Manufacturer Part Number=N.A., Note=N.A., Pad Count=2, Part Number=L0201-N.C., Part number IPS=N.A., PartId=100300001, Published=2013-04-10, Supplier 1=N.A., Supplier 2=N.A., Supplier Part Number 1=N.A., Supplier Part Number 2=N.A.
L5: library part L0201-6n2-Wirewound-Murata, "Inductor, 360mA, ±5%, 220mOhm, Q=39", Manufacturer=Murata, Manufacturer Part Number=LQW03AW6N2J00, Part number IPS=00000001915, Supplier Part Number 1=490-13840-1-ND, Artikkelnr Noca=N.A., Component Class=Inductors, ComponentLink1Description=Datasheet, ComponentLink1URL=https://search.murata.co.jp/Ceramy/image/img/P02/JELF243A-0109.pdf, ComponentLink2Description="Supplier link", ComponentLink2URL=N.A., Footprint Doc=0201, HelpURL=https://psearch.en.murata.com/inductor/product/LQW03AW6N2J00%23.html, LatestRevisionDate=2018-10-22, Note="-55°C ~ 125°C", Pad Count=2, Part Number=L0201-6n2-Wirewound-Murata, PartId=100300180, Published=2018-10-22, Supplier 1=Digi-Key, Supplier 2=N.A., Supplier Part Number 2=N.A.
L6: library part L0201-5n1-Wirewound-Murata, "Inductor, 480mA, ±5%, 140mOhm, Q=45", Manufacturer=Murata, Manufacturer Part Number=LQW03AW5N1J00, Part number IPS=00000001789, Supplier Part Number 1=490-13839-1-ND, Artikkelnr Noca=N.A., Component Class=Inductors, ComponentLink1Description=Datasheet, ComponentLink1URL=https://search.murata.co.jp/Ceramy/image/img/P02/JELF243A-0109.pdf, ComponentLink2Description="Supplier link", ComponentLink2URL=N.A., Footprint Doc=0201, HelpURL=https://psearch.en.murata.com/inductor/product/LQW03AW5N1J00%23.html, LatestRevisionDate=2018-10-22, Note="-55°C ~ 125°C", Pad Count=2, Part Number=L0201-5n1-Wirewound-Murata, PartId=100300176, Published=2018-10-22, Supplier 1=Digi-Key, Supplier 2=N.A., Supplier Part Number 2=N.A.
L7: library part L0201-4n7-Wirewound-Murata, "Inductor, 620mA, ±5%, 90mOhm, Q=45", Manufacturer=Murata, Manufacturer Part Number=LQW03AW4N7J00, Part number IPS=00000001790, Supplier Part Number 1=490-13838-1-ND, Artikkelnr Noca=N.A., Component Class=Inductors, ComponentLink1Description=Datasheet, ComponentLink1URL=https://search.murata.co.jp/Ceramy/image/img/P02/JELF243A-0109.pdf, ComponentLink2Description="Supplier link", ComponentLink2URL=N.A., Footprint Doc=0201, HelpURL=https://psearch.en.murata.com/inductor/product/LQW03AW4N7J00%23.html, LatestRevisionDate=2018-10-22, Note="-55°C ~ 125°C", Pad Count=2, Part Number=L0201-4n7-Wirewound-Murata, PartId=100300175, Published=2018-10-22, Supplier 1=Digi-Key, Supplier 2=N.A., Supplier Part Number 2=N.A.
L8: library part L0603-15n-Wirewound-Murata, "Inductor, 700mA, ±5%, 85mΩ, Q=42 @ 250MHz", Manufacturer=Murata, Manufacturer Part Number=LQW18AN15NJ10, Part number IPS=00000004111, Supplier Part Number 1=490-6867-1-ND, Artikkelnr Noca=N.A., Component Class=Inductors, ComponentLink1Description=Datasheet, ComponentLink1URL=https://search.murata.co.jp/Ceramy/image/img/P02/JELF243A-0026.pdf, ComponentLink2Description="Supplier link", ComponentLink2URL=N.A., Footprint Doc=0603, HelpURL=https://psearch.en.murata.com/inductor/product/LQW18AN15NJ10%23.html, LatestRevisionDate=2020-01-07, Note="-55°C ~ 125°C", Pad Count=2, Part Number=L0603-15n-Wirewound-Murata, PartId=100300395, Published=2019-01-11, Supplier 1=Digi-Key, Supplier 2=Mouser, Supplier Part Number 2=81-LQW18AN15NJ10D
L9: library part L0201-3n9, "Inductor, 400mA, ±0.1nH", Manufacturer=Murata, Manufacturer Part Number=LQP03TN3N9B02D, Part number IPS=00000001253, Supplier Part Number 1=N.A., Artikkelnr Noca=N.A., Component Class=Inductors, ComponentLink1Description=Datasheet, ComponentLink1URL=N.A., ComponentLink2Description="Supplier link", ComponentLink2URL=N.A., Footprint Doc=0201, HelpURL=N.A., LatestRevisionDate=2017-11-09, Note=N.A., Pad Count=2, Part Number=L0201-3n9, PartId=100300022, Published=2013-04-10, Supplier 1=N.A., Supplier 2=N.A., Supplier Part Number 2=N.A.
L10: library part L0201-4n7, "Inductor, 350mA, ±3%", Manufacturer=Murata, Manufacturer Part Number=LQP03TN4N7H02D, Part number IPS=00000001792, Supplier Part Number 1=N.A., Artikkelnr Noca=N.A., Component Class=Inductors, ComponentLink1Description=Datasheet, ComponentLink1URL=N.A., ComponentLink2Description="Supplier link", ComponentLink2URL=N.A., Footprint Doc=0201, HelpURL=N.A., LatestRevisionDate=2013-04-10, Note=N.A., Pad Count=2, Part Number=L0201-4n7, PartId=100300024, Published=2013-04-10, Supplier 1=N.A., Supplier 2=N.A., Supplier Part Number 2=N.A.
L11: library part L0603-10µ, "Inductor, 80mA, ±10%", Manufacturer="Taiyo Yuden", Manufacturer Part Number=LBMF1608T100K, Part number IPS=00000007794, Supplier Part Number 1=587-1714-1-ND, Artikkelnr Noca=33029314, Component Class=Inductors, ComponentLink1Description=Datasheet, ComponentLink1URL=N.A., ComponentLink2Description="Supplier link", ComponentLink2URL=N.A., Footprint Doc=0603, HelpURL=http://www.yuden.co.jp/ut/product/pdf/elb2_e.pdf, LatestRevisionDate=2012-09-19, Note="LBMF1608T100K 10µH 80mA 0603", Pad Count=2, Part Number=L0603-10µ, PartId=100300078, Published=2010-02-24, Supplier 1=Digi-Key, Supplier 2=Farnell, Supplier Part Number 2=178-6105
L12: library part L0402-15n, "Inductor, 320mA, ±5%", Manufacturer="Taiyo Yuden", Manufacturer Part Number=HK100515NJ-T, Part number IPS=00000001262, Supplier Part Number 1=587-1521-1-ND, Artikkelnr Noca=33029323, Component Class=Inductors, ComponentLink1Description=Datasheet, ComponentLink1URL=N.A., ComponentLink2Description="Supplier link", ComponentLink2URL=N.A., Footprint Doc=0402, HelpURL=http://www.yuden.co.jp/productdata/catalog/en/mlci04_e.pdf, LatestRevisionDate=2012-09-19, Note="High frequency chip inductor ±10%", Pad Count=2, Part Number=L0402-15n, PartId=100300056, Published=2010-07-12, Supplier 1=Digi-Key, Supplier 2=Farnell, Supplier Part Number 2=658-1328
L13 L14: library part L0806-2µ2-1.2A-110mOhm, "Shielded Multilayer Inductor, 1.2A, ±20%, 110mOhm, Q=10 @ 1MHz", Manufacturer="Wurth Elektronik", Manufacturer Part Number=74479776222A, Part number IPS=80000001820, Supplier Part Number 1=732-2954-1-ND, Artikkelnr Noca=N.A., Component Class=Inductors, ComponentLink1Description=Datasheet, ComponentLink1URL=https://katalog.we-online.de/pbs/datasheet/74479776222.pdf, ComponentLink2Description="Supplier link", ComponentLink2URL=N.A., Footprint Doc=0806, HelpURL=https://media.digikey.com/PDF/Data%20Sheets/Wurth%20Electronics%20PDFs/Passive_Components_Products_Catalog.pdf, LatestRevisionDate=2020-01-07, Note=N.A., Pad Count=2, Part Number=L0806-2µ2-1.2A-110mOhm, PartId=100300125, Published=2019-01-11, Supplier 1=Digi-Key, Supplier 2=Mouser, Supplier Part Number 2=710-74479776222
L15: library part L0201-2n7-HQ-Murata, "Inductor, 600mA, ±0.1ｎH, 120mOhm", Manufacturer=Murata, Manufacturer Part Number=LQP03HQ2N7B02, Part number IPS=00000001753, Supplier Part Number 1=490-13909-1-ND, Artikkelnr Noca=N.A., Component Class=Inductors, ComponentLink1Description=Datasheet, ComponentLink1URL=https://search.murata.co.jp/Ceramy/image/img/P02/JELF243C-0021.pdf, ComponentLink2Description="Supplier link", ComponentLink2URL=N.A., Footprint Doc=0201, HelpURL=https://psearch.en.murata.com/inductor/product/LQP03HQ2N7B02%23.html, LatestRevisionDate=2018-10-23, Note="-55°C ~ 125°C", Pad Count=2, Part Number=L0201-2n7-HQ-Murata, PartId=100300214, Published=2018-10-23, Supplier 1=Digi-Key, Supplier 2=N.A., Supplier Part Number 2=N.A.
LD1: library part LTST-C19HE1WT, "RGB LED 1.60 mm x 1.60 mm SMD", Manufacturer="Lite-On Inc", Part number IPS=00000007798, Supplier Part Number 1=160-2162-1-ND, Artikkelnr Noca=N.A., Component Class=Optoelectronics, ComponentLink1Description=Datasheet, ComponentLink1URL=N.A., ComponentLink2Description="Supplier link", ComponentLink2URL=N.A., Footprint Doc=LED_RGB_0606, HelpURL=http://optoelectronics.liteon.com/upload/download/DS22-2008-0044/S_110_LTST-C19HE1WT.pdf, LatestRevisionDate=2016-09-23, Manufacturer Part Number=LTST-C19HE1WT, Note=N.A., Pad Count=4, Part Number=LTST-C19HE1WT, PartId=101400093, Published=2016-09-23, Supplier 1=Digi-Key, Supplier 2=Mouser, Supplier Part Number 2=859-LTST-C19HE1WT
LD2 LD3: library part MSL0104RGBU1, "High brightness, side view RGB LED", Manufacturer="Rohm Semiconductor", Part number IPS=00000007799, Supplier Part Number 1=MSL0104RGBU1CT-ND, Artikkelnr Noca=N.A., Component Class=Optoelectronics, ComponentLink1Description=Datasheet, ComponentLink1URL=N.A., ComponentLink2Description="Supplier link", ComponentLink2URL=N.A., Footprint Doc=6922, HelpURL=http://www.rohm.com/web/eu/datasheet/MSL0104RGBU, LatestRevisionDate=2016-09-21, Manufacturer Part Number=MSL0104RGBU1, Note=N.A., Pad Count=7, Part Number=MSL0104RGBU1, PartId=101400028, Published=2016-09-21, Supplier 1=Digi-Key, Supplier 2=Mouser, Supplier Part Number 2=755-MSL0104RGBU1
P1 P2 P3 P4 P5: library part "Pin List 1x2, N.C.", "Pin List 1x2, 2.54mm (100mil)", Manufacturer=N.A., Artikkelnr Noca=N.A., Assembly="Not mounted", Component Class=Connectors, ComponentLink1Description=Datasheet, ComponentLink1URL=N.A., ComponentLink2Description="Supplier link", ComponentLink2URL=N.A., Footprint Doc=LIST_1x2, HelpURL=N.A., LatestRevisionDate=2017-02-02, Manufacturer Part Number=N.A., Note=N.A., Pad Count=2, Part Number="Pin List 1x2, N.C.", Part number IPS=N.A., PartId=100500298, Published=2017-01-30, Supplier 1=N.A., Supplier 2=N.A., Supplier Part Number 1=N.A., Supplier Part Number 2=N.A.
P6: library part "Pin Header 2x3 TH, 2.00mm, N.C.", "Pin Header 2x3, TH, 2.00mm", Manufacturer=N.A., Artikkelnr Noca=N.A., Assembly="Not mounted", Component Class=Connectors, ComponentLink1Description=Datasheet, ComponentLink1URL=N.A., ComponentLink2Description="Supplier link", ComponentLink2URL=N.A., Footprint Doc=HDR_2x3_TH_2.00MM-NC, HelpURL=N.A., LatestRevisionDate=2019-01-21, Manufacturer Part Number=N.A., Note=N.A., Pad Count=6, Part Number="Pin Header 2x3 TH, 2.00mm, N.C.", Part number IPS=N.A., PartId=100500247, Published=2019-01-21, Supplier 1=N.A., Supplier 2=N.A., Supplier Part Number 1=N.A., Supplier Part Number 2=N.A.
P7: library part "Pin Header 2x5 TH, 2.00mm, N.C.", "Pin Header 2x5, TH, 2.00mm", Manufacturer=N.A., Artikkelnr Noca=N.A., Assembly="Not mounted", Component Class=Connectors, ComponentLink1Description=Datasheet, ComponentLink1URL=N.A., ComponentLink2Description="Supplier link", ComponentLink2URL=N.A., Footprint Doc=HDR_2x5_TH_2.00MM-NC, HelpURL=N.A., LatestRevisionDate=2019-01-21, Manufacturer Part Number=N.A., Note=N.A., Pad Count=6, Part Number="Pin Header 2x5 TH, 2.00mm, N.C.", Part number IPS=N.A., PartId=100500264, Published=2019-01-21, Supplier 1=N.A., Supplier 2=N.A., Supplier Part Number 1=N.A., Supplier Part Number 2=N.A.
P8: library part "Pin Header 2x5 SMD, 1.27mm, Angled", "Pin Header 2x5, 1.27mm (50mil)", Manufacturer=W-CON, Manufacturer Part Number=1325B-1205S0Z080CR02, Part number IPS=00000007800, Artikkelnr Noca=N.A., Component Class=Connectors, ComponentLink1Description=Datasheet, ComponentLink1URL=N.A., ComponentLink2Description="Supplier link", ComponentLink2URL=N.A., Footprint Doc=HDR_2x5-SMD-1.27mm-ANG, HelpURL=\\hizz\pro\app9717\Datasheet\connectors\W-CON\1325B-12XXXXZXXXCXXX.pdf, LatestRevisionDate=2019-11-20, Note=N.A., Pad Count=10, Part Number="Pin Header 2x5 SMD, 1.27mm, Angled", PartId=100500257, Published=2014-01-22, Supplier 1=Cabcon, Supplier 2=Samtec, Supplier Part Number 1=1325B-1205S0Z080CR02, Supplier Part Number 2=FTSH-105-01-L-DH-A-C-TR
Q2 Q3 Q4 Q6 Q7: "Dual N Ch MOFET, 5.8A, 55mOhm max, 620mW", Manufacturer="Taiwan Semiconductor", Part number IPS=00000001703, Supplier Part Number 1=TSM250N02DCQRFGCT-ND, Artikkelnr Noca=N.A., Component Class=Semiconductors, ComponentLink1Description=Datasheet, ComponentLink1URL=https://www.taiwansemi.com/products/datasheet/TSM250N02D_B15.pdf, ComponentLink2Description="Supplier link", ComponentLink2URL=N.A., Footprint Doc=VDFN-6, HelpURL=https://www.taiwansemi.com/products/datasheet/TSM250N02D_B15.pdf, LatestRevisionDate=2018-10-31, Manufacturer Part Number="TSM250N02DCQ RFG", Note=N.A., Pad Count=6, Part Number="TSM250N02DCQ RFG", PartId=101300161, Published=2018-10-31, Supplier 1=Digi-Key, Supplier 2=N.A., Supplier Part Number 2=N.A.
Q5: "BC847C, NPN Silicon transistor", Manufacturer="NXP Semiconductors", Part number IPS=00000001793, Supplier Part Number 1=108-1235, Artikkelnr Noca=35019020, Component Class=Semiconductors, ComponentLink1Description=Datasheet, ComponentLink1URL=N.A., ComponentLink2Description="Supplier link", ComponentLink2URL=N.A., Footprint Doc=SOT-23a, HelpURL=N.A., LatestRevisionDate=2009-11-23, Manufacturer Part Number=BC847C, Note="NPN Epitaxial Silicon Transistor", Pad Count=3, Part Number=BC847C, PartId=101300006, Published=2009-05-10, Supplier 1=Farnell, Supplier 2=Digi-Key, Supplier Part Number 2=568-1636-1-ND
Q8: "N-Channel MOSFET, 20V, 1A, 470mOhm, 400mW", Manufacturer="Rohm Semiconductor", Part number IPS=00000009976, Supplier Part Number 1=RV2C010UNT2LCT-ND, Artikkelnr Noca=35010020, Component Class=Semiconductors, ComponentLink1Description=Datasheet, ComponentLink1URL=N.A., ComponentLink2Description="Supplier link", ComponentLink2URL=N.A., Footprint Doc=DFN-3, HelpURL=http://rohmfs.rohm.com/en/products/databook/datasheet/discrete/transistor/mosfet/rv2c010unt2l-e.pdf, LatestRevisionDate=2016-08-09, Manufacturer Part Number=RV2C010UNT2L, Note=N.A., Pad Count=3, Part Number=RV2C010UNT2L, PartId=101300132, Published=2016-08-09, Supplier 1=Digi-Key, Supplier 2=Mouser, Supplier Part Number 2=755-RV2C010UNT2L
R1 R2 R3 R8 R21 R47: library part R0201-1k0, "Resistor, ±1%, 0.05W", Manufacturer=N.A., Part number IPS=00000005786, Artikkelnr Noca=N.A., Component Class=Resistors, ComponentLink1Description=Datasheet, ComponentLink1URL=N.A., ComponentLink2Description="Supplier link", ComponentLink2URL=N.A., Footprint Doc=0201, HelpURL=N.A., LatestRevisionDate=2014-11-13, Manufacturer Part Number=N.A., Note="Chip Res 1%", Pad Count=2, Part Number=R0201-1k0, PartId=100100043, Published=2014-11-13, Supplier 1=N.A., Supplier 2=N.A., Supplier Part Number 1=N.A., Supplier Part Number 2=N.A.
R4 R5 R6 R30 R32 R41 R42 R43 R44 R45 R46 R49: library part R0201-1M0, "Resistor, ±1%, 0.05W", Manufacturer=N.A., Part number IPS=00000001418, Artikkelnr Noca=N.A., Component Class=Resistors, ComponentLink1Description=Datasheet, ComponentLink1URL=N.A., ComponentLink2Description="Supplier link", ComponentLink2URL=N.A., Footprint Doc=0201, HelpURL=N.A., LatestRevisionDate=2014-11-13, Manufacturer Part Number=N.A., Note="Chip Res 1%", Pad Count=2, Part Number=R0201-1M0, PartId=100100093, Published=2014-11-13, Supplier 1=N.A., Supplier 2=N.A., Supplier Part Number 1=N.A., Supplier Part Number 2=N.A.
R7 R27 R28 R34 R35 R36 R37: library part R0201-10k, "Resistor, ±1%, 0.05W", Manufacturer=N.A., Part number IPS=00000001255, Artikkelnr Noca=N.A., Component Class=Resistors, ComponentLink1Description=Datasheet, ComponentLink1URL=N.A., ComponentLink2Description="Supplier link", ComponentLink2URL=N.A., Footprint Doc=0201, HelpURL=N.A., LatestRevisionDate=2014-11-13, Manufacturer Part Number=N.A., Note="Chip Res 1%", Pad Count=2, Part Number=R0201-10k, PartId=100100065, Published=2014-11-13, Supplier 1=N.A., Supplier 2=N.A., Supplier Part Number 1=N.A., Supplier Part Number 2=N.A.
R9 R10 R11 R38: library part R0201-0R, "Resistor, ±5%, 0.05W", Manufacturer=N.A., Part number IPS=00000003245, Artikkelnr Noca=N.A., Component Class=Resistors, ComponentLink1Description=Datasheet, ComponentLink1URL=N.A., ComponentLink2Description="Supplier link", ComponentLink2URL=N.A., Footprint Doc=0201, HelpURL=N.A., LatestRevisionDate=2017-11-09, Manufacturer Part Number=N.A., Note="Chip Res 5%", Pad Count=2, Part Number=R0201-0R, PartId=100100001, Published=2014-11-13, Supplier 1=N.A., Supplier 2=N.A., Supplier Part Number 1=N.A., Supplier Part Number 2=N.A.
R12: library part R0201-100, "Resistor, ±1%, 0.05W", Manufacturer=N.A., Part number IPS=00000001794, Artikkelnr Noca=N.A., Component Class=Resistors, ComponentLink1Description=Datasheet, ComponentLink1URL=N.A., ComponentLink2Description="Supplier link", ComponentLink2URL=N.A., Footprint Doc=0201, HelpURL=N.A., LatestRevisionDate=2014-11-13, Manufacturer Part Number=N.A., Note="Chip Res 1%", Pad Count=2, Part Number=R0201-100, PartId=100100027, Published=2014-11-13, Supplier 1=N.A., Supplier 2=N.A., Supplier Part Number 1=N.A., Supplier Part Number 2=N.A.